# Altium PCB Urukul.PcbDoc (part 15 of 15)
Units mm, origin at the board's own origin, x right, y up, seen from the top; angles counter-clockwise.
Board outline 161.99 x 100 mm, 6 copper layers (L1, L2, L3, L4, P5, L6), stack 1.548 mm thick; 1078 components, 609 nets, 3798 pads, 2552 vias.
Unrouted connection lines stored in the file: 1.
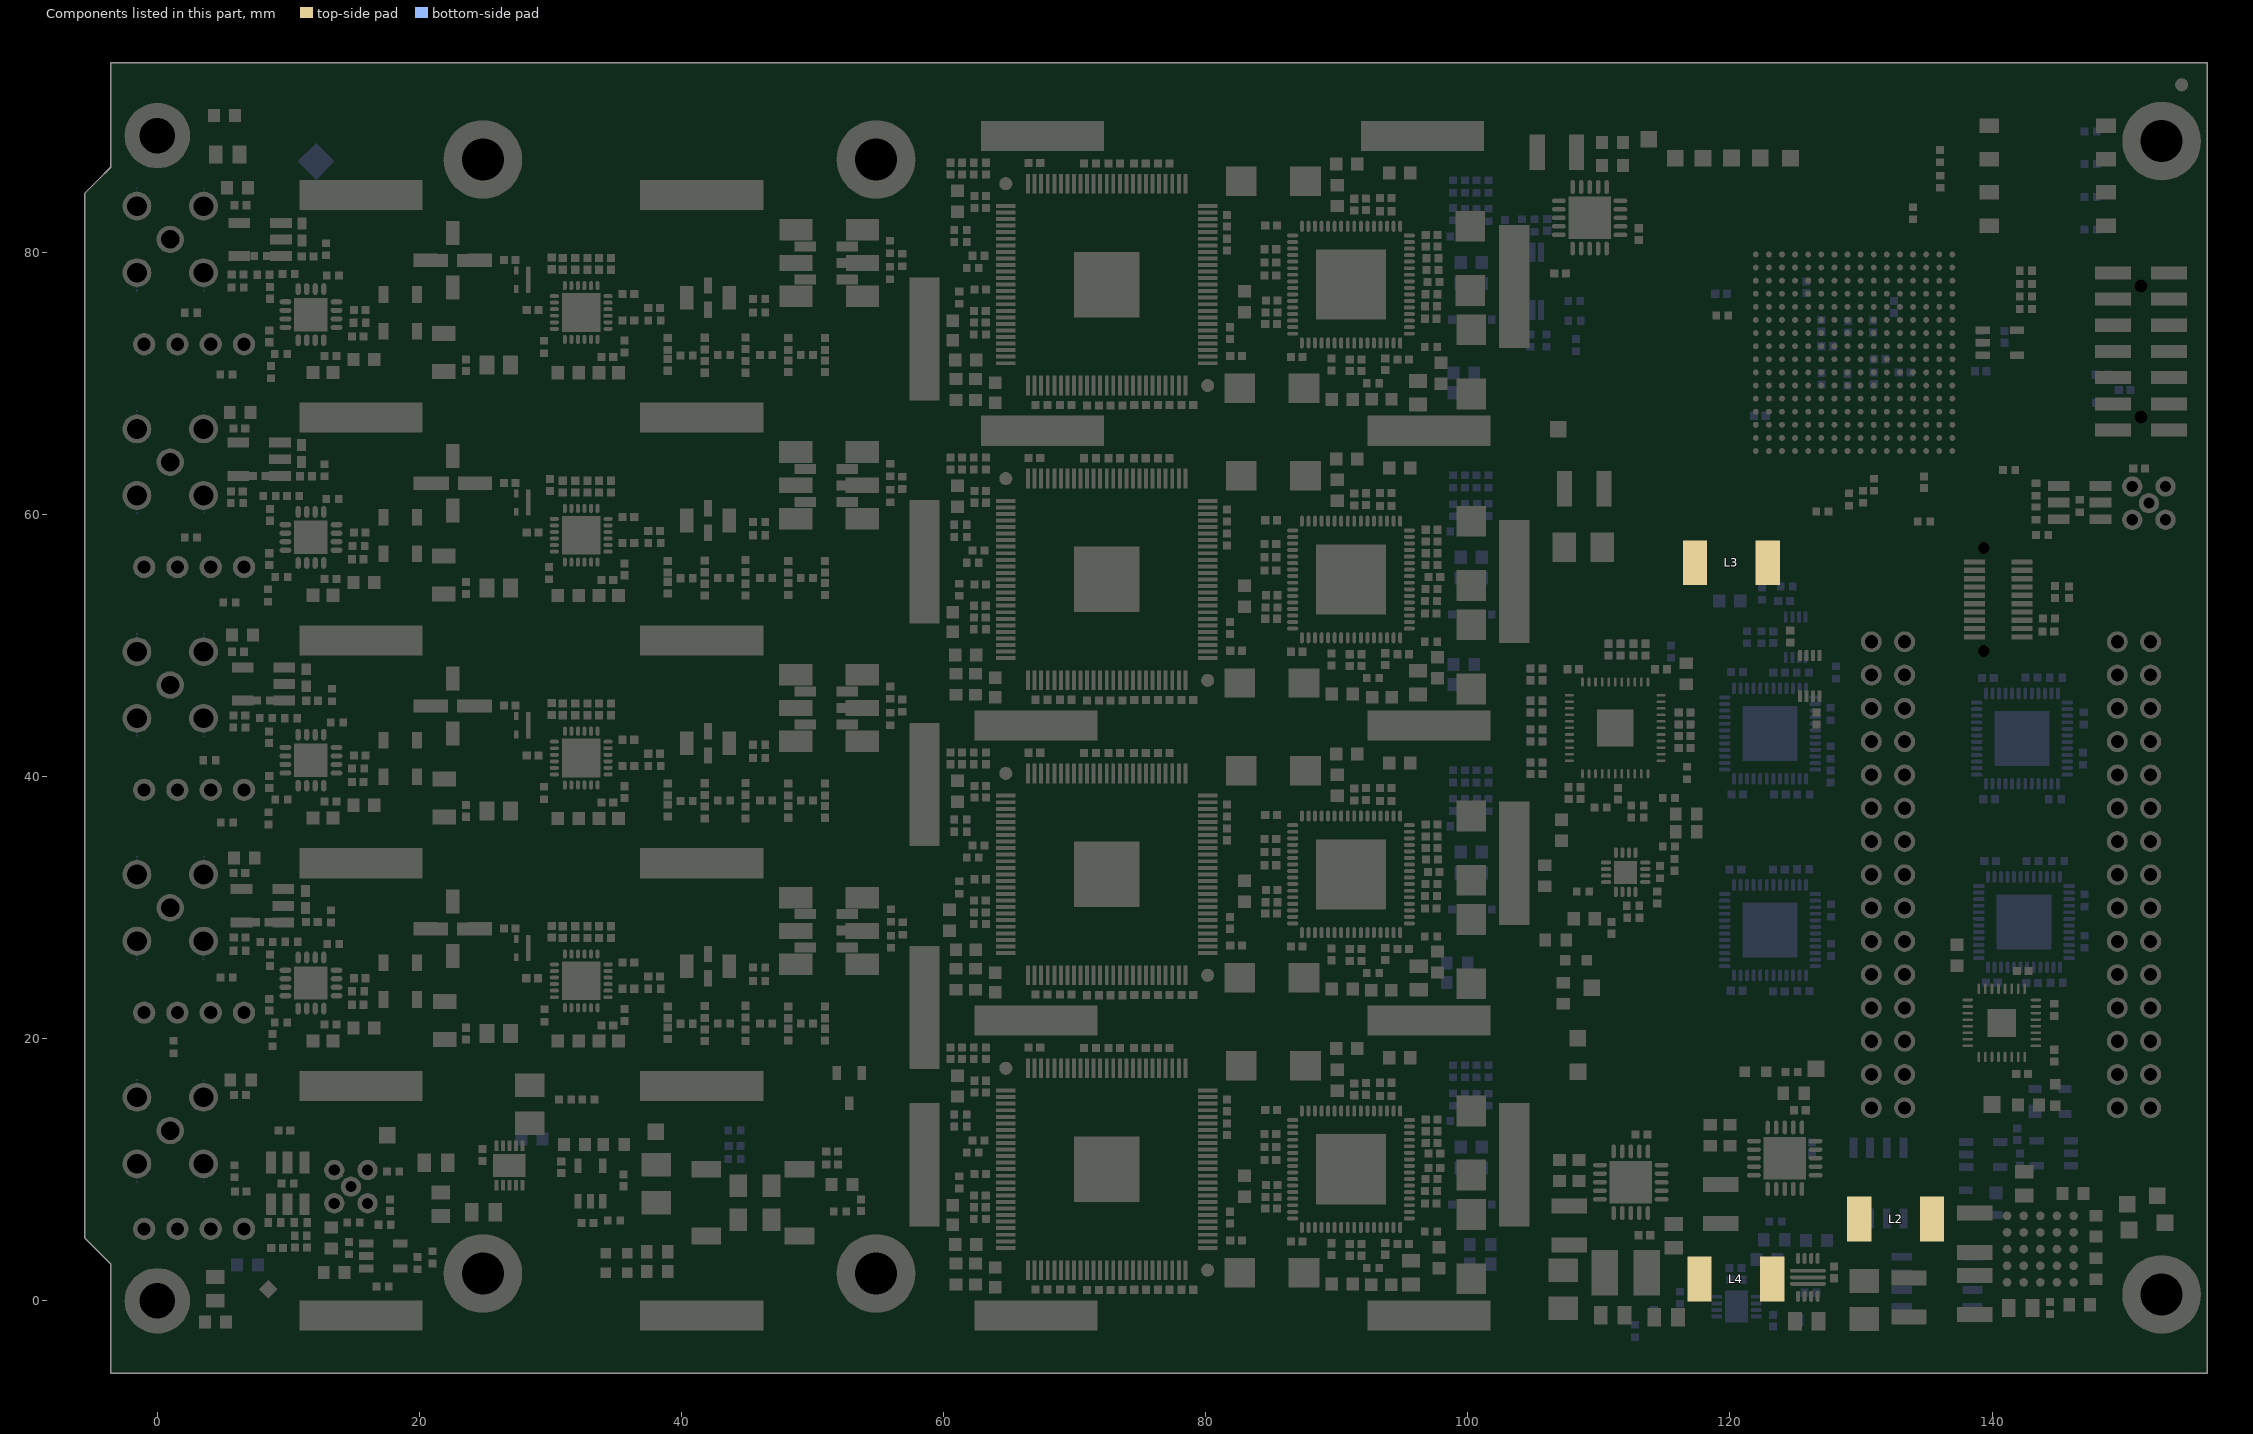
[diagram p17: the components of this part, seen from the top]

## Polygon pours and split planes (outlines as drawn) (continued)
P1V8A on L1 "Top-No Net" (solid, remove dead copper, pour order 182): 28 vertices, not listed, extent 83.588,67.738 90.194,71.391
P1V8A on L1 "Top-No Net" (solid, remove dead copper, pour order 176): 28 vertices, not listed, extent 83.588,45.238 90.194,48.891
GND on L1 "Top-No Net" (solid, remove dead copper, pour order 168): 27 vertices, not listed, extent 65.694,49.738 77.444,61.738
P3V3_DRVB on L1 "Top-No Net" (solid, remove dead copper, pour order 164): 24 vertices, not listed, extent 70.944,44.433 84.694,61.738
P3V3_DACB on L1 "Top-No Net" (solid, remove dead copper, pour order 160): 19 vertices, not listed, extent 93.694,57.488 101.694,64.238
P3V3_DACB on L1 "Top-No Net" (solid, remove dead copper, pour order 158): 60.294,61.488 64.194,61.488 64.194,57.238 68.194,57.238 68.194,62.738 61.194,62.738 60.244,62.738 60.202,62.696 60.194,62.688 60.194,61.738 60.194,61.588 60.294,61.488
P1V8_CLK_VDDB on L1 "Top-No Net" (solid, remove dead copper, pour order 146): 65.444,55.738 65.444,48.041 69.194,48.041 69.194,50.238 69.194,53.738 68.194,54.738 67.194,55.738 65.444,55.738
P1V8_CLK_VDDA on L1 "Top-No Net" (solid, remove dead copper, pour order 144): 65.444,78.238 65.444,70.541 69.194,70.541 69.194,72.738 69.194,76.238 68.194,77.238 67.194,78.238 65.444,78.238
P3V3A on L1 "P3V3A_L01_P136" (solid, remove dead copper, pour order 136): 94.473,42.499 96.612,42.499 96.723,42.388 96.723,41.249 96.723,40.499 96.473,40.249 95.973,40.249 95.024,40.249 94.973,40.3 94.973,41.55 94.723,41.55 94.473,41.8 94.473,42.488
P3V3A on L1 "P3V3A_L01_P134" (solid, remove dead copper, pour order 134): 94.473,64.999 96.612,64.999 96.723,64.888 96.723,63.749 96.723,62.999 96.473,62.749 95.973,62.749 95.024,62.749 94.973,62.8 94.973,64.05 94.723,64.05 94.473,64.3 94.473,64.988
P3V3A on L1 "P3V3A_L01_P132" (solid, remove dead copper, pour order 132): 94.473,87.499 96.612,87.499 96.723,87.388 96.723,86.249 96.723,85.499 96.473,85.249 95.973,85.249 95.024,85.249 94.973,85.3 94.973,86.55 94.723,86.55 94.473,86.8 94.473,87.488
P3V3A on L1 "P3V3A_L01_P130" (solid, remove dead copper, pour order 130): 94.473,19.999 96.612,19.999 96.723,19.888 96.723,18.749 96.723,17.999 96.473,17.749 95.973,17.749 95.024,17.749 94.973,17.8 94.973,19.05 94.723,19.05 94.473,19.3 94.473,19.988
GND on L1 "GND_L01_P126" (solid, remove dead copper, pour order 126): 29.223,28.323 35.473,28.323 35.473,29.823 29.223,29.823 29.223,28.323
GND on L1 "GND_L01_P124" (solid, remove dead copper, pour order 124): 29.223,45.323 35.473,45.323 35.473,46.823 29.223,46.823 29.223,45.323
GND on L1 "GND_L01_P122" (solid, remove dead copper, pour order 122): 29.123,79.274 35.373,79.274 35.373,80.774 29.123,80.774 29.123,79.274
GND on L1 "GND_L01_P118" (solid, remove dead copper, pour order 118): 29.223,62.249 35.473,62.249 35.473,63.749 29.223,63.749 29.223,62.249
P5V0A on L1 "P5V0A_L01_P078" (solid, remove dead copper, pour order 78): 23 vertices, not listed, extent 29.723,8.999 33.044,14.249
P1V8A on L1 "P1V8A_L01_P056" (solid, remove dead copper, pour order 56): 106.544,89.821 111.044,89.821 111.044,87.488 110.794,87.238 110.694,87.138 110.044,87.138 110.044,84.138 109.194,83.288 106.944,83.288 102.644,83.288 100.189,85.743 100.189,86.966 103.044,89.821
GND on L1 "GND_L01_P102" (solid, remove dead copper, pour order 102): 137.082,4.613 142.821,4.613 142.821,2.903 142.571,2.903 140.543,2.903 140.415,2.795 140.425,2.785 140.321,2.681 140.321,1.153 140.321,1.042 140.171,0.893 137.193,0.893 137.082,1.003
GND on L1 "GND_L01_P138" (solid, remove dead copper, pour order 138): 104.473,-0.271 104.473,0.499 104.723,0.749 108.473,0.749 108.723,0.499 108.794,0.499 109.506,0.499 110.723,-0.717 110.723,-2.062 110.723,-2.489 110.711,-2.501 104.473,-2.501 104.473,-0.251
P1V8_CLK_VDDB on L1 "Top-No Net" (solid, remove dead copper, pour order 152): 29 vertices, not listed, extent 90.194,45.038 101.989,51.738
P3V3_DRVA on L1 "Top-No Net" (solid, remove dead copper, pour order 188): 24 vertices, not listed, extent 70.944,66.933 84.694,84.238
P1V8_CLK_VDDD on L1 "Top-No Net" (solid, remove dead copper, pour order 230): 28 vertices, not listed, extent 90.194,0.038 101.989,6.738
GND on L1 "Top-No Net" (solid, remove dead copper, pour order 234): 86.719,59.538 86.766,59.491 95.572,59.491 95.459,59.378 95.459,50.591 95.414,50.546 86.665,50.546
GND on L1 "Top-No Net" (solid, remove dead copper, pour order 278): 86.719,14.538 86.766,14.491 95.572,14.491 95.459,14.378 95.459,5.591 95.414,5.546 86.665,5.546
P7V5A on L1 "Top-No Net" (solid, remove dead copper, pour order 300): 112.944,-2.262 112.944,-0.012 111.944,-0.012 111.944,4.238 102.444,4.238 102.444,-0.762 104.194,-0.762 104.194,0.488 104.444,0.738 104.694,0.988 109.194,0.988 109.444,0.738 110.694,0.738 110.694,-2.012 110.944,-2.262
GND on L1 "Top-No Net" (solid, remove dead copper, pour order 276): 86.719,37.038 86.766,36.991 95.572,36.991 95.459,36.878 95.459,28.091 95.414,28.046 86.665,28.046
no net on L6 "balancing" (solid, pour order 370): -3.005,91.491 155.862,91.491 155.862,-3.409 -3.005,-3.409 -3.005,3.236 -5.582,5.814 -5.582,84.119 -3.005,86.697
P3V3 on L6 "NONET_L-01_P-001" (solid, remove dead copper, pour order 358): 117.154,76.374 117.154,72.112 117.334,53.155 118.837,51.613 120.253,51.613 120.907,52.267 120.907,54.575 122.321,55.988 124.431,55.988 155.166,55.988 155.67,56.492 155.67,86.316 151.131,90.855 131.635,90.855
P3V3_DACD on L6 "Top-No Net" (solid, remove dead copper, pour order 268): 21 vertices, not listed, extent 61.994,14.738 95.944,19.238
P3V3_DACC on L6 "Top-No Net" (solid, remove dead copper, pour order 262): 21 vertices, not listed, extent 61.969,37.238 95.944,41.738
P3V3_DACB on L6 "Top-No Net" (solid, remove dead copper, pour order 162): 21 vertices, not listed, extent 61.744,59.738 95.944,64.238
P7V5A on L6 "P7V5A_L06_P074" (solid, remove dead copper, pour order 74): 23 vertices, not listed, extent 27.473,-1.041 104.223,6.999
P3V3_DACA on L6 "Top-No Net" (solid, remove dead copper, pour order 256): 21 vertices, not listed, extent 61.444,82.238 95.944,86.738
GND on L6 "L6-GND 2" (solid, pour order 338): 55.444,66.528 55.444,52.541 6.452,52.541 6.452,66.048 6.944,66.541 6.957,66.528
P1V8_CLK_VDDC on L6 "Top-No Net" (solid, remove dead copper, pour order 264): 35 vertices, not listed, extent 67.444,22.538 95.444,29.488
GND on L6 "L6-GND" (solid, pour order 342): 55.444,32.528 55.444,18.541 6.452,18.541 6.452,32.048 6.944,32.541 6.957,32.528
GND on L6 "L6-GND 1" (solid, pour order 340): 55.444,49.528 55.444,35.541 6.452,35.541 6.452,49.048 6.944,49.541 6.957,49.528
P7V5 on L6 "NONET_L-01_P-001" (solid, remove dead copper, pour order 352): 118.286,3.506 118.286,0.442 118.824,-0.096 120.963,-0.096 121.621,0.562 121.621,2.057 123.308,3.744 123.308,5.478 123.037,5.749 121.122,5.749 118.88,3.506
GND on L6 "NONET_L-01_P-001" (solid, remove dead copper, pour order 350): 121.808,2.284 121.808,0.541 124.266,0.541 124.308,0.499 125.408,1.599 127.472,1.599 128.334,2.46 128.334,3.812 128.033,4.112 125.188,4.112 124.208,3.132 124.208,2.284
P1V8_CLK_VDDA on L6 "Top-No Net" (solid, remove dead copper, pour order 258): 36 vertices, not listed, extent 67.444,67.788 95.444,74.488
P1V8A on L6 "Top Layer-No Net" (solid, remove dead copper, pour order 318): 99.343,18.968 99.343,20.035 100.765,21.458 105.769,21.458 105.972,21.254 105.972,20.25 105.656,19.934 101.629,19.934 101.476,19.781 101.476,18.53 101.305,18.359 99.647,18.359 99.343,18.664
GND on L6 "L6-GND 3" (solid, pour order 336): 55.444,83.528 55.444,69.541 6.452,69.541 6.452,83.048 6.944,83.541 6.957,83.528
P1V8_CLK_VDDD on L6 "Top-No Net" (solid, remove dead copper, pour order 270): 33 vertices, not listed, extent 67.444,1.988 95.444,7.488
P1V8_DRVD on L6 "Top-No Net" (solid, remove dead copper, pour order 266): 19 vertices, not listed, extent 95.694,6.238 100.194,10.988
P1V8_DRVC on L6 "Top-No Net" (solid, remove dead copper, pour order 260): 19 vertices, not listed, extent 95.694,28.738 100.194,33.488
P1V8_DRVA on L6 "Top-No Net" (solid, remove dead copper, pour order 254): 19 vertices, not listed, extent 95.694,73.738 100.194,78.488
P1V8_DRVB on L6 "Top-No Net" (solid, remove dead copper, pour order 180): 19 vertices, not listed, extent 95.694,51.238 100.194,55.988
P1V8_CLK_VDDB on L6 "Top-No Net" (solid, remove dead copper, pour order 156): 35 vertices, not listed, extent 67.444,45.288 95.444,51.988
GND on L2 "NONET_L-01_P-001" (solid, remove dead copper, pour order 364): -3.28,94.116 -3.005,94.116 155.87,94.116 155.87,-5.259 -3.28,-5.259 -3.28,2.842 -5.306,4.868 -5.306,84.465 -3.28,86.491
GND on P5 (split plane): 19 vertices, not listed, extent -5.046,-5.001 155.928,93.978

## Keep-outs
L1:
  lines w0.203: 2.848,2.87 -3.251,2.87 -5.505,5.124 -5.505,84.252 -3.707,86.05 2.848,86.05 ; 2.848,91.491 151.294,91.491 ; 155.444,2.636 155.444,86.316
  lines w0.254: 2.746,-2.114 2.746,-2.696 2.848,-2.797 3.46,-3.409 113.821,-3.409 151.326,-3.409 152.023,-2.712 ; 2.848,0.757 2.848,2.87 ; 2.848,86.05 2.848,86.79 ; 2.848,91.079 2.848,91.491 ; 2.873,88.056 2.873,89.657
L6:
  lines w0.203: 2.848,2.87 -3.251,2.87 -5.505,5.124 -5.505,84.252 -3.707,86.05 2.848,86.05 ; 2.848,91.491 151.294,91.491 ; 155.444,2.636 155.444,86.316
  lines w0.254: 2.848,2.87 2.848,-2.797 3.46,-3.409 113.821,-3.409 114.518,-2.712 152.023,-2.712 ; 2.848,86.05 2.848,91.491
Keep-Out Layer:
  drawing of 7286 lines, arcs and shapes, not listed

## Other copper
L1:
  rectangle net GND: 85.979,69.311 86.665,69.743
  rectangle net GND: 119.661,-1.71 121.297,0.737
  rectangle net GND: 46.894,78.438 55.294,79.863
  rectangle net NetJ3_1: 6.972,79.426 7.165,80.051
  rectangle net RF_OUT0: 8.54,79.44 8.724,80.051
  rectangle net NetJ4_1: 6.872,62.638 7.065,63.263
  rectangle net RF_OUT1: 8.44,62.653 8.624,63.263
  rectangle net NetJ5_1: 7.211,45.488 7.404,46.113
  rectangle net RF_OUT2: 8.779,45.503 8.964,46.113
  rectangle net RF_OUT3: 8.669,28.578 8.853,29.188
  rectangle net NetJ6_1: 7.101,28.563 7.294,29.188
  rectangle net GND: 29.373,29.024 35.373,29.638
  rectangle net GND: 29.373,46.024 35.373,46.663
  rectangle net GND: 29.251,63.11 35.251,63.61
  rectangle net GND: 29.373,80.024 35.373,80.524
  rectangle net P7V5: 116.367,1.206 119.2,2.391
  rectangle net NetC73_2: 134.024,5.783 136.857,6.968
  rectangle net P3V6: 128.474,5.783 131.307,6.968
  rectangle net NetC161_2: 121.498,55.709 124.332,56.895
  rectangle net P2V1: 116.895,54.055 117.775,58.559
  rectangle net P2V1: 115.948,55.709 118.782,56.895
  rectangle net P2V1: 107.873,79.338 108.182,80.213
  rectangle net P2V1: 109.144,79.132 109.401,80.141
  rectangle net P2V1: 108.458,79.37 108.817,80.153
  rectangle net GND: 81.091,51.516 81.626,52.038
  rectangle net GND: 80.991,53.113 81.244,53.541
  rectangle net GND: 80.991,55.041 81.266,55.541
  rectangle net GND: 89.145,-1.595 90.085,0.005
  rectangle net NetC101_2: 49.294,8.388 51.044,11.638
  rectangle net GND: 97.155,19.888 97.485,20.396
  rectangle net GND: 59.157,-1.219 62.644,0.038
  rectangle net GND: 71.444,-2.262 92.644,-1.112
  rectangle net GND: 101.448,-2.224 104.902,-1.162
  rectangle net GND: 64.944,-0.512 65.444,2.488
  rectangle net GND: 70.944,-0.271 71.178,0.306
  rectangle net P3V6: 132.734,1.288 133.325,1.88
  rectangle net P3V6: 126.949,9.169 127.533,10.947
  rectangle net P3V6: 125.12,7.518 125.933,8.077
  rectangle net P1V8_DVDDC: 85.522,34.087 85.928,34.544
  rectangle net P3V3_DRVD: 84.519,5.638 85.438,6.563
  rectangle net P3V3_DRVC: 84.419,27.888 85.438,28.942
  rectangle net P3V3_DRVB: 84.369,50.688 85.903,51.488
  rectangle net P3V3_DRVA: 84.619,73.113 85.744,73.938
  rectangle net P5V0A: 17.144,69.338 18.219,69.963
  rectangle net P5V0A: 16.919,52.413 18.194,53.113
  rectangle net P5V0A: 17.169,35.313 18.194,36.063
  rectangle net P5V0A: 16.969,17.988 18.144,18.963
  rectangle net P3V3_DACB: 61.294,62.263 63.269,62.913
  rectangle net P3V3_DACA: 61.419,84.813 63.019,85.438
  rectangle net P3V3_DACC: 61.269,39.788 63.294,40.413
  rectangle net P3V3_DACD: 61.194,17.301 63.244,17.988
  rectangle net P3V3_DRVB: 92.419,63.088 93.691,63.749
  rectangle net P3V3_DRVC: 94.069,30.788 94.769,31.263
  rectangle net P3V3_DRVD: 94.119,8.338 94.819,8.738
  rectangle net P3V3_DRVD: 92.194,17.738 93.694,18.488
  rectangle net P3V3_DRVC: 92.194,40.238 93.694,40.988
  rectangle net P3V3_DRVA: 92.194,85.238 93.694,85.988
  rectangle net NetC91_2: 108.356,48.336 108.687,48.793
  rectangle net NetC91_2: 107.493,36.551 108.585,37.033
  rectangle net NetC91_2: 107.694,36.551 108.915,37.685
  rectangle net P1V8_DVDDB: 80.874,50.902 81.737,51.181
  rectangle net P3V3_DRVB: 80.848,58.395 81.458,58.674
  rectangle net P1V8_DVDDB: 80.848,59.411 81.559,59.665
  rectangle net P1V8_DVDDD: 80.848,5.893 81.661,6.172
  rectangle net P3V3_DRVD: 80.823,13.411 81.407,13.665
  rectangle net P1V8_DVDDD: 80.823,14.402 81.432,14.681
  rectangle net P1V8_DVDDC: 80.823,28.397 81.737,28.677
  rectangle net P3V3_DRVC: 80.721,35.89 81.534,36.195
  rectangle net P1V8_DVDDC: 80.797,36.891 81.344,37.186
  rectangle net P3V3_DACD: 96.418,12.954 96.672,13.64
  rectangle net P3V3_DACD: 95.534,12.7 96.622,13.291
  rectangle net P3V3_DACC: 96.418,35.484 96.698,36.119
  rectangle net P3V3_DACC: 95.809,35.23 96.622,35.839
  rectangle net P3V3_DACB: 96.393,58.039 96.622,58.572
  rectangle net P3V3_DACB: 95.834,57.734 96.495,58.293
  rectangle net P3V3_DACA: 96.393,80.442 96.784,81.338
  rectangle net P3V3_DACA: 95.86,80.213 96.571,80.89
  rectangle net GND: 46.723,27.488 55.419,28.932
  rectangle net GND: 46.819,61.463 55.369,62.883
  rectangle net GND: 27.973,25.749 29.473,27.999
  rectangle net GND: 27.973,59.749 29.473,61.999
  rectangle net GND: 27.973,76.749 29.473,78.999
  rectangle net GND: 21.294,29.638 23.794,31.138
  rectangle net GND: 21.294,25.638 23.794,27.138
  rectangle net GND: 21.294,80.638 23.794,82.138
  rectangle net GND: 21.294,76.638 23.794,78.138
  rectangle net GND: 21.294,63.638 23.794,65.138
  rectangle net GND: 21.294,59.638 23.794,61.138
  rectangle net GND: 21.294,42.638 23.794,44.138
  rectangle net GND: 21.294,46.638 23.794,48.138
  rectangle net GND: 28.344,42.913 29.594,44.913
  rectangle net GND: 46.819,44.538 55.494,45.883
  rectangle net GND: 55.118,79.578 55.626,79.934
  rectangle net GND: 54.966,78.892 55.626,79.197
  rectangle net GND: 55.067,62.535 55.524,62.941
  rectangle net GND: 55.067,61.798 55.524,62.281
  rectangle net GND: 55.016,45.644 55.651,46.025
  rectangle net GND: 55.067,44.704 55.626,45.11
  rectangle net GND: 55.093,28.829 55.702,29.235
  rectangle net GND: 55.067,27.762 55.753,28.143
  rectangle net GND: 55.22,62.586 55.651,62.916
  rectangle net GND: 55.347,61.925 55.677,62.154
  rectangle net GND: 67.462,86.614 67.843,86.944
  rectangle net P3V3_DRVA: 76.175,86.995 76.505,87.325
  rectangle net GND: 79.197,81.407 79.426,81.661
  rectangle net GND: 81.026,77.597 81.382,78.003
  rectangle net GND: 81.026,75.616 81.28,75.997
  rectangle net GND: 81.077,74.041 81.661,74.549
  rectangle net GND: 78.969,71.577 79.248,71.806
  rectangle net GND: 62.306,59.461 63.83,60.046
  rectangle net GND: 62.332,81.991 63.856,82.601
  rectangle net GND: 62.306,36.982 63.779,37.567
  rectangle net GND: 62.281,14.478 63.856,15.113
  rectangle net P1V8A: 83.287,7.112 83.49,7.493
  rectangle net GND: 80.95,6.553 81.585,7.01
  rectangle net GND: 80.975,8.128 81.229,8.509
  rectangle net GND: 81.026,10.084 81.255,10.516
  rectangle net GND: 81.128,11.557 81.619,12.954
  rectangle net P1V8_DVDDD: 81.813,14.351 82.169,14.503
  rectangle net P3V3_DRVD: 76.149,19.431 76.53,19.812
  rectangle net P1V8_DVDDD: 75.311,18.872 75.565,19.05
  rectangle net GND: 67.564,19.152 67.843,19.431
  rectangle net GND: 74.727,3.302 74.93,3.581
  rectangle net GND: 67.539,41.631 67.818,41.935
  rectangle net P3V3_DRVC: 76.149,42.012 76.53,42.291
  rectangle net GND: 79.197,36.424 79.426,36.652
  rectangle net GND: 81.153,34.087 81.636,35.433
  rectangle net GND: 81.001,32.588 81.331,33.02
  rectangle net GND: 81.026,30.632 81.28,31.064
  rectangle net GND: 81.051,29.058 81.686,29.54
  rectangle net GND: 79.07,26.594 79.223,27
  rectangle net P3V3_DRVB: 85.344,51.283 85.623,51.816
  rectangle net P1V8A: 83.363,52.197 83.541,52.426
  rectangle net P1V8_DVDDB: 85.471,55.601 85.827,55.956
  rectangle net P1V8_DVDDB: 85.522,56.642 85.827,56.998
  rectangle net GND: 79.197,58.928 79.426,59.157
  rectangle net P3V3_DRVB: 76.175,64.465 76.556,64.846
  rectangle net P1V8_DVDDA: 85.496,79.146 85.827,79.502
  rectangle net P1V8_DVDDA: 85.522,78.08 85.827,78.486
  rectangle net P1V8A: 83.337,74.676 83.541,74.905
  rectangle net GND: 95.631,72.009 95.936,72.263
  rectangle net P1V8_DRVA: 96.444,77.775 96.799,78.054
  rectangle net P1V8_DRVA: 95.783,78.13 96.215,78.41
  rectangle net P1V8_DACCLKA: 95.834,79.324 96.596,79.756
  rectangle net DAC_OUTRA_N: 93.726,81.382 93.878,81.686
  rectangle net DAC_OUTRA_P: 94.336,81.382 94.488,81.763
  rectangle net GND: 92.075,84.303 92.456,84.658
  rectangle net P1V8_DRVC: 96.444,32.664 96.825,33.045
  rectangle net P1V8_DACCLKC: 95.783,34.315 96.545,34.773
  rectangle net P1V8_DACCLKD: 95.86,11.76 96.571,12.268
  rectangle net P1V8_DRVD: 96.139,10.312 96.545,10.846
  rectangle net P3V3_DRVC: 94.844,30.81 94.971,31.09
  rectangle net GND: 94.818,28.854 94.971,29.108
  rectangle net P1V8_DVDDD: 85.471,11.608 85.852,12.04
  rectangle net P1V8_DVDDD: 85.471,10.592 85.852,10.998
  rectangle net P1V8_DRVD: 96.495,10.287 96.749,10.693
  rectangle net DAC_OUTRD_P: 94.386,13.818 94.488,14.275
  rectangle net DAC_OUTRD_N: 93.701,13.818 93.98,14.275
  rectangle net GND: 92.227,16.866 92.532,17.196
  rectangle net P1V8A: 91.288,18.136 91.567,18.999
  rectangle net GND: 79.197,36.424 79.426,36.678
  rectangle net DAC_OUTRC_P: 94.209,36.271 94.488,36.779
  rectangle net DAC_OUTRC_N: 93.701,36.347 93.98,36.779
  rectangle net P1V8A: 91.262,40.615 91.643,41.631
  rectangle net P3V3_DRVC: 93.066,40.843 93.624,41.224
  rectangle net GND: 94.767,51.333 94.996,51.537
  rectangle net GND: 81.28,79.07 81.636,80.162
  rectangle net GND: 81.178,56.566 81.636,57.912
  rectangle net P3V3A: 110.719,5.893 111.379,6.121
  rectangle net P3V6: 113.436,5.893 114.148,6.121
  rectangle net P3V3A: 109.296,7.29 109.525,9.449
  rectangle net P3V6: 115.341,7.417 115.824,9.474
  rectangle net GND: 113.792,40.107 114.071,40.335
  rectangle net NetC60_2: 105.816,43.358 106.299,43.586
  rectangle net NetC62_2: 105.943,44.552 106.248,44.755
  rectangle net NetC91_2: 108.204,47.676 108.712,47.955
  rectangle net NetC91_2: 113.716,47.879 114.071,48.235
  rectangle net P7V5A: 108.153,1.88 109.652,2.413
  rectangle net P7V5A: 109.225,3.15 109.644,3.522
  rectangle net NetC73_2: 140.95,0.663 141.331,2.491
  rectangle net NetC73_2: 140.595,0.637 141.488,1.059
  rectangle net NetC161_2: 140.417,4.903 140.773,5.768
  rectangle net DAC_OUTRB_P: 94.334,58.796 94.463,59.279
  rectangle net DAC_OUTRB_N: 93.678,58.79 93.958,59.231
  rectangle net P3V3_DACB: 94.662,60.048 94.803,60.122
  rectangle net GND: 108.255,0.238 109.044,0.787
  rectangle net GND: 100.051,10.668 100.482,10.998
  rectangle net GND: 79.146,13.919 79.502,14.148
  rectangle net GND: 100.051,55.55 100.457,56.007
  rectangle net GND: 67.462,64.135 67.894,64.44
  rectangle net GND: 29.82,75.006 30.175,75.184
  rectangle net GND: 100.051,78.054 100.457,78.511
  rectangle net P1V8_DACCLKB: 95.86,56.82 96.545,57.277
  rectangle net P1V8_DVDDC: 81.966,28.397 82.423,28.702
  rectangle net RFSW_CTRL1: 13.818,57.734 14.199,58.115
  rectangle net RFSW_CTRL1: 14.376,57.709 14.935,57.937
  rectangle net RFSW_CTRL3: 14.326,23.698 14.808,23.927
  rectangle net RFSW_CTRL0: 14.402,74.676 14.935,74.93
  rectangle net P1V8_DRVB: 96.462,55.238 96.994,55.491
  rectangle net NetC73_2: 140.569,1.806 141.142,2.314
  rectangle net RFSW_CTRL2: 14.326,40.691 14.808,40.945
  rectangle net GND: 37.897,14.376 45.796,15.85
  rectangle net GND: 37.897,31.376 45.796,32.85
  rectangle net GND: 37.897,48.376 45.796,49.85
  rectangle net GND: 37.897,65.376 45.796,66.85
  rectangle net GND: 37.897,82.376 45.796,83.85
  rectangle net GND: 11.897,82.376 19.796,83.85
  rectangle net GND: 11.897,65.376 19.796,66.85
  rectangle net GND: 11.297,48.237 19.196,49.71
  rectangle net GND: 11.897,31.376 19.796,32.85
  rectangle net GND: 11.757,14.237 19.657,15.71
  region net GND: 45.191,0.9 37.292,0.9 37.292,-0.573 45.191,-0.573
  rectangle net GND: 10.044,32.888 11.044,33.888
  rectangle net GND: 20.044,32.888 21.044,33.888
  rectangle net GND: 20.044,49.888 21.044,50.888
  rectangle net GND: 10.044,49.888 11.044,50.888
  rectangle net GND: 20.044,66.888 21.044,67.888
  rectangle net GND: 10.044,66.888 11.044,67.888
  rectangle net GND: 20.044,83.888 21.044,84.888
  rectangle net GND: 10.044,83.888 11.044,84.888
  rectangle net GND: 46.044,83.888 47.044,84.888
  rectangle net GND: 36.044,83.888 37.044,84.888
  rectangle net GND: 46.044,66.888 47.044,67.888
  rectangle net GND: 36.044,66.888 37.044,67.888
  rectangle net GND: 46.044,49.888 47.044,50.888
  rectangle net GND: 36.044,49.888 37.044,50.888
  rectangle net GND: 46.044,32.888 47.044,33.888
  rectangle net GND: 36.044,32.888 37.044,33.888
  rectangle net GND: 20.044,15.888 21.044,16.888
  rectangle net GND: 10.044,15.888 11.044,16.888
  rectangle net GND: 46.044,15.888 47.044,16.888
  rectangle net GND: 36.044,15.888 37.044,16.888
  rectangle net GND: 20.044,-1.612 21.044,-0.612
  rectangle net GND: 10.044,-1.612 11.044,-0.612
  rectangle net NetC91_2: 108.356,47.808 109.16,48.336
  rectangle net NetC47C_2: 8.694,38.238 9.004,38.541
  rectangle net LOOP_FILTERD: 96.694,3.791 97.444,4.291
  rectangle net NetC44A_2: 95.194,68.491 95.694,68.791
  rectangle net P3V3_DACB: 98.444,60.563 99.194,61.041
  rectangle net NetC44B_2: 94.557,46.213 94.944,46.541
  rectangle net P3V3_DACC: 98.694,37.791 99.442,38.564
  rectangle net P3V3_DACD: 98.694,15.541 99.346,16.064
  rectangle net P1V8_CLK_VDDC: 65.697,30.394 65.944,30.541
  rectangle net P1V8_CLK_VDDC: 65.697,32.136 65.803,32.188
  rectangle net P1V8_CLK_VDDB: 65.697,54.541 66.082,54.688
  rectangle net P1V8_CLK_VDDB: 65.697,52.858 66.082,53.041
  rectangle net P1V8_CLK_VDDA: 65.697,77.041 66.082,77.238
  rectangle net P1V8_CLK_VDDA: 65.694,75.291 65.944,75.541
  rectangle net P1V8_CLK_VDDD: 65.697,9.541 65.944,9.738
  rectangle net P1V8_CLK_VDDD: 65.694,7.791 65.944,8.041
  rectangle net P1V8_DVDDD: 88.694,19.041 88.944,19.541
  rectangle net NetC44C_2: 93.944,23.383 95.88,23.72
  rectangle net P3V3_CLK2: 126.262,46.885 126.427,47.257
  rectangle net P3V3A: 109.194,8.291 109.694,8.541
  rectangle net GND: 96.574,22.296 97.006,22.788
  rectangle net P1V8_CLK_VDDA: 93.704,69.456 93.783,69.609
  rectangle net P1V8_CLK_VDDC: 97.147,24.427 98.758,24.607
  rectangle net P1V8A: 111.001,21 111.662,22.423
  rectangle net P1V8A: 105.108,20.086 105.743,21.153
  rectangle net P3V3: 120.907,9.875 121.187,10.536
  rectangle net P1V8_CLK_VDDC: 97.133,24.302 98.657,24.633
  rectangle net P3V3A: 109.452,8.885 109.706,9.037
  rectangle net P3V6: 132.261,1.265 132.998,1.62
  pour cut-out: 4.84,30.894 22.092,30.894 23.452,29.534 37.303,29.534 39.277,27.56 45.09,27.56 45.744,28.214 45.744,31.142 46.731,32.129 55.301,32.129 57.35,30.08 57.35,25.764 55.784,24.199 53.904,24.199 52.594,22.888 52.594,21.014 51.724,20.145 29.285,20.145 28.337,21.092 28.337,24.001 26.571,25.767 21.345,25.767 17.257,21.679 8.297,21.679 7.195,22.781 7.195,28.234 5.838,29.592 4.84,29.592
  pour cut-out: 4.944,47.79 22.196,47.79 23.556,46.43 37.407,46.43 39.381,44.456 45.194,44.456 45.848,45.111 45.848,48.039 46.835,49.025 55.405,49.025 57.454,46.976 57.454,42.66 55.888,41.095 54.008,41.095 52.698,39.784 52.698,37.91 51.828,37.041 29.389,37.041 28.441,37.989 28.441,40.897 26.675,42.663 21.449,42.663 17.361,38.575 8.401,38.575 7.299,39.677 7.299,45.131 5.942,46.488 4.944,46.488
  pour cut-out: 4.944,64.79 22.196,64.79 23.556,63.43 37.407,63.43 39.381,61.456 45.194,61.456 45.848,62.111 45.848,65.039 46.835,66.025 55.405,66.025 57.454,63.976 57.454,59.66 55.888,58.095 54.008,58.095 52.698,56.784 52.698,54.91 51.828,54.041 29.389,54.041 28.441,54.989 28.441,57.897 26.675,59.663 21.449,59.663 17.361,55.575 8.401,55.575 7.299,56.677 7.299,62.131 5.942,63.488 4.944,63.488
  pour cut-out: 4.944,81.79 22.196,81.79 23.556,80.43 37.407,80.43 39.381,78.456 45.194,78.456 45.848,79.111 45.848,82.039 46.835,83.025 55.405,83.025 57.454,80.976 57.454,76.66 55.888,75.095 54.008,75.095 52.698,73.784 52.698,71.91 51.828,71.041 29.389,71.041 28.441,71.989 28.441,74.897 26.675,76.663 21.449,76.663 17.361,72.575 8.401,72.575 7.299,73.677 7.299,79.131 5.942,80.488 4.944,80.488
L3:
  rectangle net P1V8_DVDDD: 85.694,17.238 86.194,18.738
  rectangle net P1V8_DVDDD: 85.694,10.488 86.194,12.188
  rectangle net P1V8_DVDDC: 85.694,32.988 86.194,34.688
  rectangle net P1V8_DVDDC: 85.694,39.738 86.194,41.238
  rectangle net P1V8_DVDDA: 85.694,77.988 86.194,79.688
  rectangle net P1V8_DVDDA: 85.694,84.738 86.194,86.238
  rectangle net P1V8_DVDDB: 85.694,62.238 86.194,63.738
  rectangle net P1V8_DVDDB: 85.694,55.488 86.194,57.188
  rectangle net GND: 140.645,-2.086 142.271,-1.573
  rectangle net GND: 104.597,0 105.867,0.508
  rectangle net GND: 108.331,0.254 109.093,0.737
  rectangle net NetC91_2: 108.677,47.859 108.92,48.392
  pour cut-out: 136.344,85.488 136.944,85.488 136.944,84.888 136.344,84.888
L4:
  rectangle net NetC91_2: 108.229,47.548 109.372,48.895
  rectangle net P1V8_DVDDD: 85.694,10.488 86.194,11.988
  rectangle net P1V8_DVDDD: 77.944,10.988 78.492,12.142
  rectangle net P1V8_DVDDC: 85.694,32.988 86.194,34.488
  rectangle net P1V8_DVDDC: 77.944,33.488 78.492,34.642
  rectangle net P1V8_DVDDA: 85.694,77.988 86.194,79.488
  rectangle net P1V8_DVDDA: 77.944,78.488 78.492,79.642
  rectangle net P1V8_DVDDB: 77.944,55.988 78.492,57.142
  rectangle net P1V8_DVDDB: 85.694,55.488 86.194,56.988
  rectangle net NetC73_2: 140.595,1.78 141.28,2.288
  rectangle net P1V8A: 111.027,21.026 111.687,22.397
  rectangle net P1V8A: 122.533,13.863 123.193,14.473
L6:
  rectangle net P1V8D: 125.831,76.887 126.391,77.188
  rectangle net P3V3: 143.589,32.354 143.818,33.446
  rectangle net LVDS1B_P: 125.917,44.899 126.171,45.153
  rectangle net EEM1_2: 119.846,41.927 120.303,42.532
  rectangle net EEM0_4: 138.071,31.146 138.242,31.743
  rectangle net EEM0_5: 138.131,29.587 138.422,30.146
  rectangle net EEM0_4: 138.071,31.146 138.422,31.808
  rectangle net EEM0_3: 138.071,40.231 138.575,40.648
  rectangle net S1A: 99.619,83.439 100,84.369
  rectangle net S4A: 100.432,83.438 100.838,84.404
  rectangle net S3A: 101.321,83.515 101.803,84.356
  rectangle net S1B: 99.568,60.918 100.025,61.9
  rectangle net S4B: 100.457,61.011 100.914,61.874
  rectangle net S3B: 101.371,60.938 101.778,61.874
  rectangle net S1D: 99.568,15.925 100,16.84
  rectangle net S4D: 100.457,15.888 100.669,16.84
  rectangle net S3D: 101.422,15.888 101.803,16.84
  rectangle net DAC_OUTRD_N: 93.726,14.002 93.958,14.046
  rectangle net DAC_OUTRD_P: 94.334,13.796 94.451,14.072
  rectangle net P3V3: 143.528,46.972 143.858,47.302
  rectangle net GND: 140.798,-2.055 142.093,-1.598
  rectangle net P3V3: 124.158,31.795 124.438,32.799
  rectangle net P3V3: 124.308,23.732 124.494,24.02
  rectangle net NetC73_2: 140.569,1.78 141.28,2.339
  rectangle net GND: 69.544,73.388 77.044,80.388
  rectangle net GND: 69.544,50.888 77.044,57.888
  rectangle net GND: 69.544,28.388 77.044,35.388
  rectangle net GND: 69.544,5.888 77.044,12.888
  rectangle net GND: 88.7,75.001 93.526,79.827
  rectangle net GND: 88.7,52.501 93.526,57.327
  rectangle net GND: 88.7,30.001 93.526,34.827
  rectangle net GND: 88.7,7.501 93.526,12.327
  rectangle net P1V8A: 122.634,13.863 123.193,14.549

## Silkscreen, mask and mechanical layers (free items; w line width, h text height)
Top Overlay:
  drawing of 1246 lines, arcs and shapes, not listed
  text "AD9910" at 130.251,90.093 h0.89
  text "P1V8A" at 112.081,89.87 h0.76
  text "TP4" at 123.511,88.55 h0.76
  text "TP2" at 119.015,88.473 h0.76
  text "TP0" at 114.951,88.397 h0.76
  text "G" at 5.007,88.31 h1.02
  text "RF OUT 0" at 2.53,85.762 h0.76
  text "TP3" at 121.301,85.248 h0.76
  text "TP1" at 117.085,85.146 h0.76
  text "G" at 7.845,84.136 h1.02
  text "MODE" at 150.444,83.541 h0.76 r90
  text "JTAG" at 146.544,69.863 h1.2 r90
  text "RF OUT 1" at -1.37,68.713 h0.76
  text "G" at 6.094,68.463 h1.02
  text "P2V1" at 105.544,67.868 h0.76
  text "INT CLK IN" at 155.419,56.613 h0.76 r90
  text "EEM 1" at 128.857,56.241 h1.52
  text "EEM 0" at 145.269,55.938 h1.52
  text "G" at 6.144,51.496 h1.02
  text "RF OUT 2" at -0.906,51.463 h0.76
  text "CPCIS CLK" at 137.719,44.838 h1.78
  text "RF OUT 3" at -0.306,34.488 h0.76
  text "G" at 6.594,34.452 h1.02
  text "WUT ISE 2023" at 123.308,30.132 h1.02 r90
  text "Urukul v1.5.6" at 120.686,28.291 h1.5 r90
  text "P3V3" at 110.834,23.8 h0.76
  text "P3V6" at 109.633,19.649 h0.76
  text "P12V0" at 123.868,19.163 h0.76
  text "P3V3A" at 109.633,17.292 h0.76
  text "G" at 7.987,16.249 h1.02
  text "EXT CLK IN" at 4.344,13.913 h0.76
  text "P7V0" at 16.469,13.763 h0.76
  text "P5V0" at 34.078,13.391 h0.76
  text "P3V3_MP" at 139.419,13.084 h0.76
  text "VCXO /  tune" at 11.719,10.938 h1.02
  text "TP6" at 153.524,8.541 h0.76
  text "TP8" at 148.726,7.543 h0.76 r90
  text "TP5" at 153.539,3.934 h0.76
  text "TP7" at 148.726,3.515 h0.76 r90
  text "P5V0A" at 29.277,3.383 h0.76
  text "P3V6" at 29.76,1.91 h0.76
  text "G" at 5.49,0.388 h1.02
Bottom Overlay:
  drawing of 1277 lines, arcs and shapes, not listed
  text "Urukul v1.5.6" at 120.819,60.088 h1.5
  text "to isolate SMAs, cut traces marked x and remove R156x resistors on top layer" at 8.59,20.813 h0.8 r270
Bottom Paste:
  drawing of 164 lines, arcs and shapes, not listed
Bottom Solder:
  rectangle: 109.75,42.231 112.703,44.989
  rectangle: 139.951,20.387 141.531,22.018
  rectangle: 69.544,73.388 77.044,80.388
  rectangle: 69.544,50.888 77.044,57.888
  rectangle: 69.544,28.388 77.044,35.388
  rectangle: 69.544,5.888 77.044,12.888
  rectangle: 88.7,75.001 93.526,79.827
  rectangle: 88.7,52.501 93.526,57.327
  rectangle: 88.7,30.001 93.526,34.827
  rectangle: 88.7,7.501 93.526,12.327
Mechanical 1:
  drawing of 201 lines, arcs and shapes, not listed
  text "Layer" at 25.491,152.019 h1.52
  text "Name" at 35.903,152.019 h1.52
  text "Material" at 59.518,152.019 h1.52
  text "Thickness" at 81.356,152.019 h1.52
  text "Constant" at 97.862,152.019 h1.52
  text "Gerber" at 112.336,152.019 h1.52
  text "Top Overlay" at 35.903,148.971 h1.52
  text "GTO" at 112.336,148.971 h1.52
  text "Top Solder" at 35.903,145.923 h1.52
  text "Solder Resist" at 59.518,145.923 h1.52
  text "0,034mm" at 81.356,145.923 h1.52
  text "3.5" at 97.862,145.923 h1.52
  text "GTS" at 112.336,145.923 h1.52
  text "1" at 25.491,142.875 h1.52
  text "L1" at 35.903,142.875 h1.52
  text "0,058mm" at 81.356,142.875 h1.52
  text "GTL" at 112.336,142.875 h1.52
  text "Dielectric1" at 35.903,139.827 h1.52
  text "FR4" at 59.518,139.827 h1.52
  text "0,180mm" at 81.356,139.827 h1.52
  text "4.2" at 97.862,139.827 h1.52
  text "2" at 25.491,136.779 h1.52
  text "L2" at 35.903,136.779 h1.52
  text "CF-004" at 59.518,136.779 h1.52
  text "0,018mm" at 81.356,136.779 h1.52
  text "G1" at 112.336,136.779 h1.52
  text "Dielectric 9" at 35.903,133.731 h1.52
  text "FR4" at 59.518,133.731 h1.52
  text "0,200mm" at 81.356,133.731 h1.52
  text "4.2" at 97.862,133.731 h1.52
  text "3" at 25.491,130.683 h1.52
  text "L3" at 35.903,130.683 h1.52
  text "0,018mm" at 81.356,130.683 h1.52
  text "G2" at 112.336,130.683 h1.52
  text "Dielectric 8" at 35.903,127.635 h1.52
  text "0,600mm" at 81.356,127.635 h1.52
  text "4.2" at 97.862,127.635 h1.52
  text "4" at 25.491,124.587 h1.52
  text "L4" at 35.903,124.587 h1.52
  text "0,018mm" at 81.356,124.587 h1.52
  text "G3" at 112.336,124.587 h1.52
  text "Dielectric4" at 35.903,121.539 h1.52
  text "FR4" at 59.518,121.539 h1.52
  text "0,200mm" at 81.356,121.539 h1.52
  text "4.2" at 97.862,121.539 h1.52
  text "5" at 25.491,118.491 h1.52
  text "P5" at 35.903,118.491 h1.52
  text "0,018mm" at 81.356,118.491 h1.52
  text "GP1" at 112.336,118.491 h1.52
  text "Dielectric3" at 35.903,115.443 h1.52
  text "FR4" at 59.518,115.443 h1.52
  text "0,180mm" at 81.356,115.443 h1.52
  text "4.2" at 97.862,115.443 h1.52
  text "6" at 25.491,112.395 h1.52
  text "L6" at 35.903,112.395 h1.52
  text "0,058mm" at 81.356,112.395 h1.52
  text "GBL" at 112.336,112.395 h1.52
  text "Bottom Solder" at 35.903,109.347 h1.52
  text "Solder Resist" at 59.518,109.347 h1.52
  text "0,034mm" at 81.356,109.347 h1.52
  text "3.5" at 97.862,109.347 h1.52
  text "GBS" at 112.336,109.347 h1.52
  text "Bottom Overlay" at 35.903,106.299 h1.52
  text "GBO" at 112.336,106.299 h1.52
  text "Total board thickness:" at 25.491,103.251 h1.52
  text "1,616mm" at 81.356,103.251 h1.52
  text "Transmission Line Structure Table" at -33.625,-24.963 h2.38
  text "Transmission Line" at -33.115,-30.504 h2.38
  text "Target Impedance" at 37.884,-30.504 h2.38
  text "Trace layer" at 76.32,-30.504 h2.38
  text "Reference layers" at 102.456,-30.504 h2.38
  text "Trace Width" at 140.86,-30.504 h2.38
  text "Gap" at 171.386,-30.504 h2.38
  text "Coated Microstrip" at -33.115,-36.022 h2.38
  text "50" at 50.857,-36.022 h2.38
  text "L1" at 83.523,-36.022 h2.38
  text "L2" at 114.397,-36.022 h2.38
  text "0.298mm" at 143.123,-36.022 h2.38
  text "Edge-Coupled Coated Microstrip" at -33.115,-41.54 h2.38
  text "100" at 49.826,-41.54 h2.38
  text "L1" at 83.523,-41.54 h2.38
  text "L2" at 114.397,-41.54 h2.38
  text "0.152mm" at 143.123,-41.54 h2.38
  text "0.160mm" at 167.166,-41.54 h2.38
  text "Edge-Coupled Offset Stripline" at -33.115,-47.059 h2.38
  text "100" at 49.826,-47.059 h2.38
  text "L3" at 83.523,-47.059 h2.38
  text "L2,L4" at 111.822,-47.059 h2.38
  text "0.150mm" at 143.123,-47.059 h2.38
  text "0.170mm" at 167.166,-47.059 h2.38
  text "Edge-Coupled Offset Stripline" at -33.115,-52.577 h2.38
  text "100" at 49.826,-52.577 h2.38
  text "L4" at 83.523,-52.577 h2.38
  text "L3,P5" at 111.617,-52.577 h2.38
  text "0.150mm" at 143.123,-52.577 h2.38
  text "0.170mm" at 167.166,-52.577 h2.38
  text "Coated Microstrip" at -33.115,-58.095 h2.38
  text "50" at 50.857,-58.095 h2.38
  text "L6" at 83.523,-58.095 h2.38
  text "P5" at 114.192,-58.095 h2.38
  text "0.298mm" at 143.123,-58.095 h2.38
  text "Edge-Coupled Coated Microstrip" at -33.115,-63.613 h2.38
  text "100" at 49.826,-63.613 h2.38
  text "L6" at 83.523,-63.613 h2.38
  text "P5" at 114.192,-63.613 h2.38
  text "0.152mm" at 143.123,-63.613 h2.38
  text "0.160mm" at 167.166,-63.613 h2.38
SHIELD:
  lines w1: 6.544,17.388 6.544,-0.612 6.544,-1.112 58.544,-1.112 ; 103.581,66.344 103.581,88.888 58.544,88.888 58.544,66.388 ; 6.544,33.388 6.544,50.388 ; 6.544,33.388 58.544,33.388 ; 6.544,33.388 6.544,16.388 58.544,16.388 ; 6.544,50.388 6.544,67.388 ; 6.544,50.388 58.544,50.388 ; 6.544,67.388 58.544,67.388 ; 6.544,67.388 6.544,84.388 19.544,84.388 58.544,84.388 58.544,67.388 ; 58.544,-1.112 103.544,-1.112 103.544,66.388 ; 58.544,-1.112 58.544,16.388 ; 58.544,-1.112 58.544,-1.112 ; 58.544,16.388 58.544,33.388 ; 58.544,33.388 58.544,50.388 ; 58.544,50.388 58.544,67.388 ; 58.544,66.388 103.544,66.388 ; 58.544,66.388 103.544,66.388 ; 58.544,21.388 103.544,21.388 58.544,21.388 ; 58.544,43.888 103.544,43.888 58.544,43.888
Mechanical 13:
  lines w0.01: -6.906,-6.296 -6.906,75.412

## Text inside footprints (layer, text, board x,y; h text height)
FL2A: Drill Drawing "Filled and" at 44.419,76.338 h0.5 r180; Drill Drawing "capped via" at 44.469,77.088 h0.5 r180
FL2B: Drill Drawing "Filled and" at 44.419,59.338 h0.5 r180; Drill Drawing "capped via" at 44.469,60.088 h0.5 r180
FL2C: Drill Drawing "Filled and" at 44.419,42.338 h0.5 r180; Drill Drawing "capped via" at 44.469,43.088 h0.5 r180
FL2D: Drill Drawing "Filled and" at 44.419,25.338 h0.5 r180; Drill Drawing "capped via" at 44.469,26.088 h0.5 r180
J1A: Top Overlay "30" at 153.495,15.362 h1.02 r270; Mechanical 14 "30" at 153.495,15.362 h1.02 r270
J1B: Top Overlay "30" at 134.725,15.361 h1.02 r270; Mechanical 14 "30" at 134.725,15.361 h1.02 r270
SW1: Top Overlay "4" at 146.911,89.28 h1 r90; Top Overlay "3" at 146.911,86.74 h1 r90; Top Overlay "ON" at 142.466,81.152 h1 r90; Top Overlay "2" at 146.911,84.2 h1 r90; Top Overlay "1" at 146.911,81.914 h1 r90; Mechanical 14 "4" at 146.911,89.28 h1 r90; Mechanical 14 "3" at 146.911,86.74 h1 r90; Mechanical 14 "ON" at 142.466,81.152 h1 r90; Mechanical 14 "2" at 146.911,84.2 h1 r90; Mechanical 14 "1" at 146.911,81.914 h1 r90